# EAGLE board unplaced_fresh (EAGLE 6.6.0)

Size 50 x 35 mm. Coordinates in mm from the lower left corner, seen from the top.
Outline: 0,0 50,0 50,35 0,35 0,0
Copper layers (1*16): Top / Bottom
Design rules "default": copper to edge 40mil
Holes 3.2 mm at 4,4 46,31

## Footprints (pad centres in the part's own frame; a part is rotated, then mirrored left to right if it is on the bottom)
R0805 = smd 1 x 1.3: 1 -0.95,0; 2 0.95,0
HDR-1X4 = drill 1 pad 1.778: 1 0,3.81; 2 0,1.27; 3 0,-1.27; 4 0,-3.81
SOIC-8 = smd 1.5 x 0.6: 1 -2.7,1.905; 2 -2.7,0.635; 3 -2.7,-0.635; 4 -2.7,-1.905; 5 2.7,-1.905; 6 2.7,-0.635; 7 2.7,0.635; 8 2.7,1.905

## Placement (x,y rotation side)
C1  100nF  [R0805]  -18,10 0 top  (outside the outline)
C2  100nF  [R0805]  -18,15 0 top  (outside the outline)
J1  IN_HDR  [HDR-1X4]  5,18 0 top
J2  OUT_HDR  [HDR-1X4]  45,18 0 top
R1  10k  [R0805]  -12,20 0 top  (outside the outline)
R2  10k  [R0805]  -12,25 0 top  (outside the outline)
R3  10k  [R0805]  -18,20 0 top  (outside the outline)
R4  10k  [R0805]  -18,25 0 top  (outside the outline)
U1  MCU  [SOIC-8]  -12,10 0 top  (outside the outline)

## Library data of the parts
C1 C2 J1 J2 R1-R4 U1 = synthetic

## Nets
FILT_L: C1.1 U1.3
FILT_R: C2.1 U1.6
GND: C1.2 C2.2 J1.4 J2.4 U1.4
IN_A: J1.1 R1.1
IN_B: J1.2 R2.1
OUT_A: J2.1 R3.2
OUT_B: J2.2 R4.2
U1_IN_A: R1.2 U1.1
U1_IN_B: R2.2 U1.2
U1_OUT_A: R3.1 U1.8
U1_OUT_B: R4.1 U1.7
VCC: J1.3 J2.3 U1.5